# Altium PCB PCB1.PcbDoc (part 2 of 2)
Units mil, origin at the board's own origin, x right, y up, seen from the top; angles counter-clockwise.
Board outline 2505 x 2250 mil, 4 copper layers (Top Layer, GND1, GND2, Bottom Layer), stack 23.756 mil thick; 96 components, 62 nets, 306 pads, 129 vias.
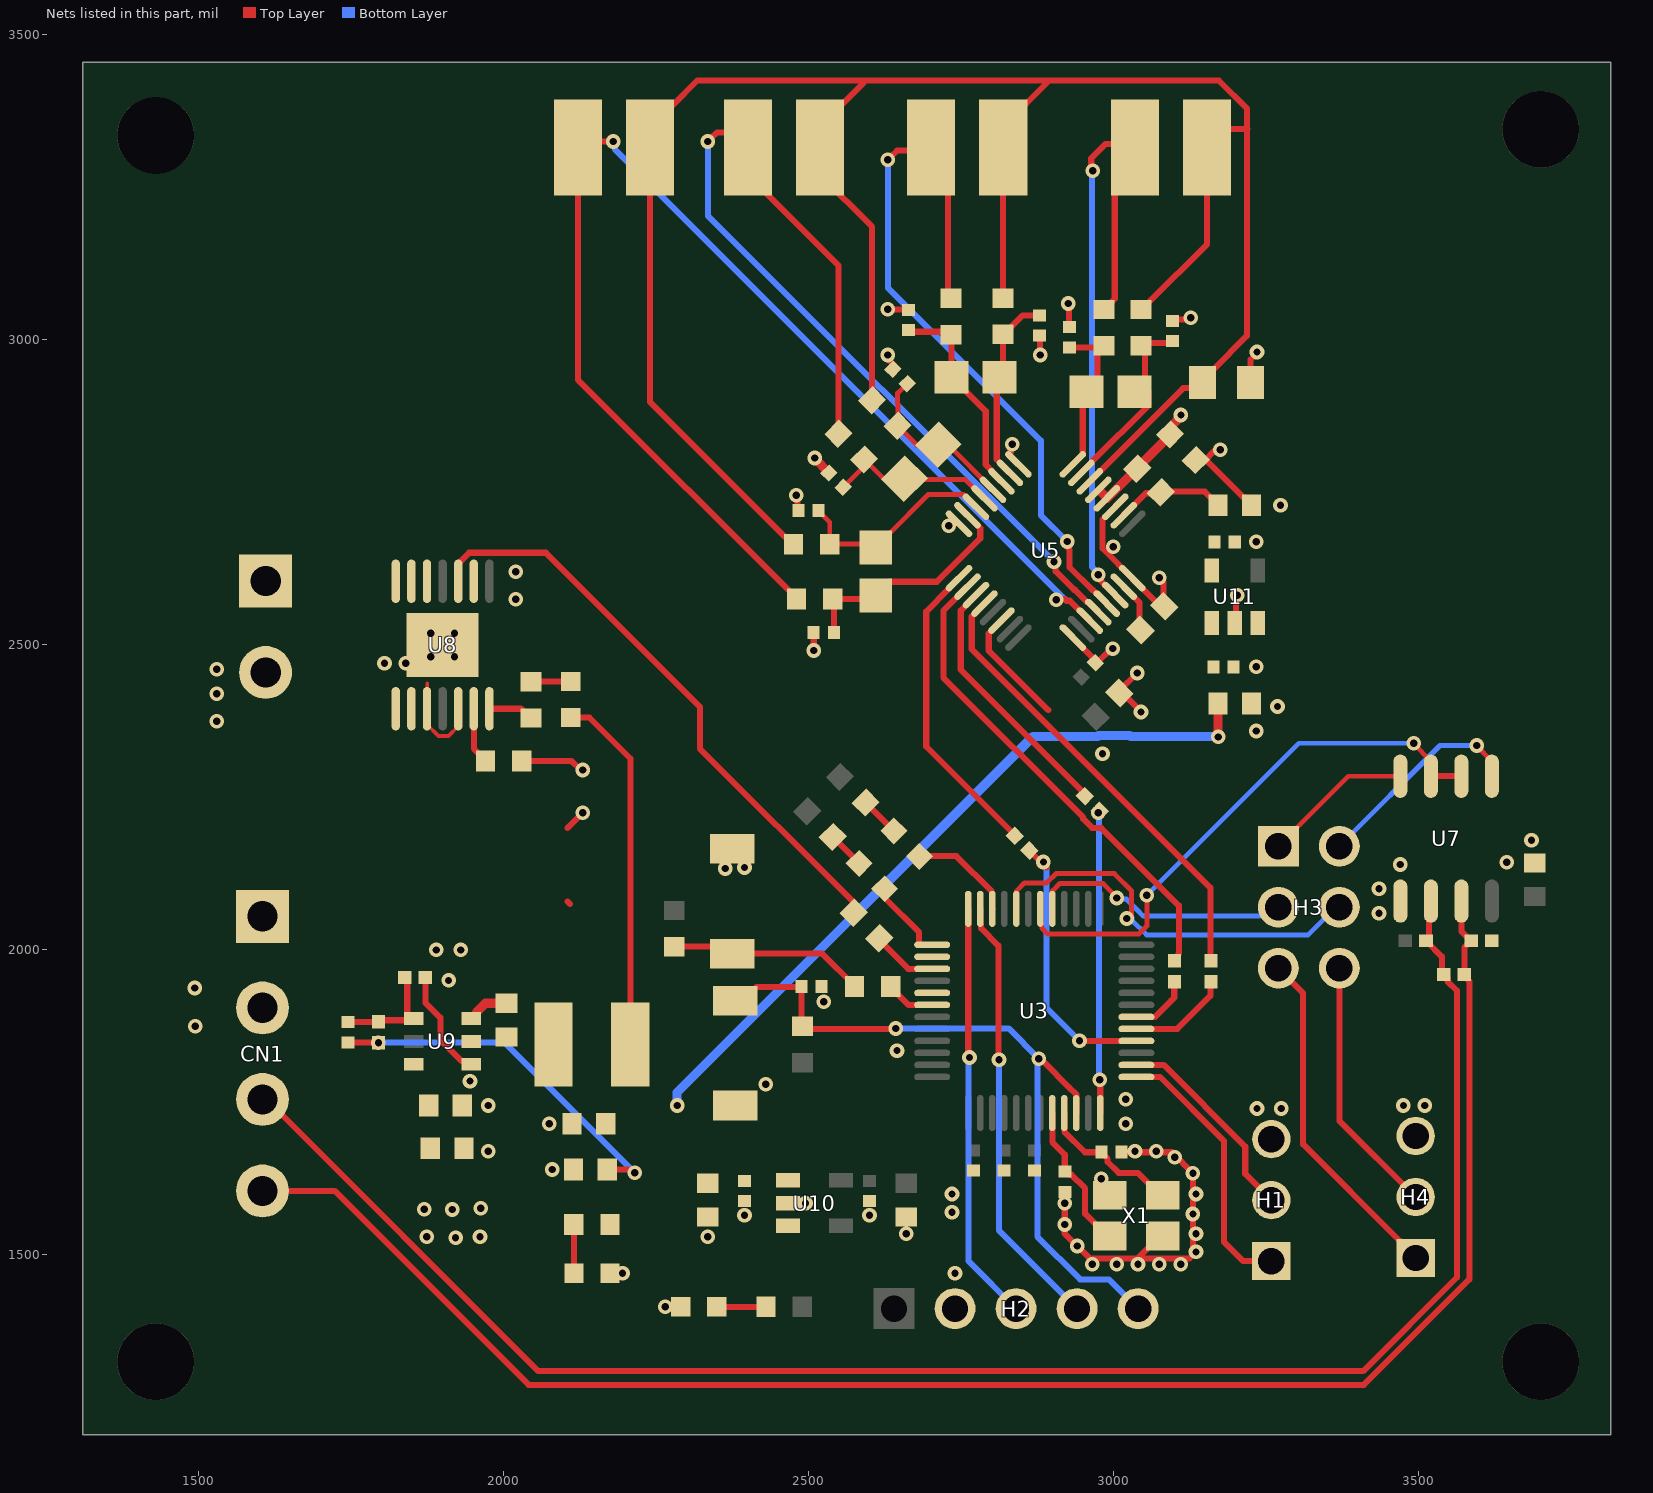
[diagram p4: the nets of this part, all layers, seen from the top]

## Via types
v1: diameter 24, hole 12, Top Layer to Bottom Layer, tented both sides, 125 vias
v2: diameter 24, hole 12, Top Layer to Bottom Layer, 4 vias

## Nets (pads, with @x,y where several pads share a name; then routed paths per layer and width w, separated by ;. In a path a pad name is that pad's centre, name@x,y a point inside that pad or via, vN(x,y) a via of type N, cw(c..) or ccw(c..) an arc to the next point about the centre after c; other vN are vias at no path point) (continued)
5V: C24.2 C25.1 C27.1 C30.2 C31.2 C34.1 C35.1 L1.2 LED2.2 R25.1 R28.2 U10.1 U10.3 U11.1 U11.3 | length 2389.4
  Top Layer w10: C24.2@1745,1848.46 1745.25,1848.21 1794.75,1848.21 v1(1795,1847.96) ; LED2.2@2110.18,2380.81 2140.93,2380.81 2207.99,2313.75 L1.2@2207.99,1845 ; C31.2@2170,1640 v1@2205,1640
  Top Layer w15: C34.1@3170.99,2403.89 3171.21,2403.67 3171.21,2349.33 v1(3171.42,2349.12)
  Bottom Layer w10: v1(1795,1847.96) 2002.04,1847.96 v1(2215,1635)
  Bottom Layer w15: v1@2284.6,1745.4 2284.6,1766.53 2867.8,2349.74 2974.05,2349.74 2975.6,2351.29 3026.48,2351.29 3028.03,2349.74 v1@3167.27,2349.74
  other v1: 2285,1745
485_RX: H3.2 U7.1 | length 344
  Top Layer w8: v1(3595,2335) 3595,2334.29 3620,2309.29 U7.1@3620,2284.73
  Bottom Layer w8: H3.2@3370,2170 3535,2335 v1@3585,2335
485_TX: H3.1 U7.4 | length 247.5
  Top Layer w8: H3.1@3270,2170 3384.73,2284.73 U7.4@3470,2284.73
A: CN1.3 R16.1 R18.2 U7.6 | length 2842.5
  Top Layer w10: CN1.3@1605,1755 1611.54,1755 2056.87,1309.67 3409.06,1309.67 3562.82,1463.43 3562.82,1933.1 3547.05,1948.87 3547.05,1954.37 3541.43,1960 R16.1@3540.92,1960 ; U7.6@3520,2080 3520,2052.59 3517.23,2049.82 3517.23,2020.19 R18.2@3512.04,2015 3537.98,1989.06 R16.1@3537.98,1963.45
A3V3: C4.1 C36.1 C37.1 U5.26 U11.5 | length 177.5
  Top Layer w10: U5.26@3016.61,2712.35 3052.78,2748.52 3076.14,2748.52 C4.1@3077.53,2749.91 3078.92,2751.3 3149.61,2751.3 C37.1@3169.66,2731.25
AIN0: C3.1 C6.2 R1.1 U5.7 | length 385.9
  Top Layer w10: C3.1@2541.54,2520 2541.54,2573.12 R1.1@2539.66,2575 2604.37,2575 C6.2@2610,2580.63 2610,2581.81 2631.57,2603.39 2710.28,2603.39 2781.37,2674.47 2781.37,2691.2 2760.5,2712.07 U5.7@2760.5,2712.35
AIN1: C6.1 C10.1 R2.1 U5.6 | length 348.3
  Top Layer w8: C10.1@2516.54,2720 2516.54,2719.21 2534.66,2701.09 R2.1@2534.66,2665 2604.37,2665 C6.1@2610,2659.37 ; C6.1@2610,2660.55 2632.57,2683.13 2632.8,2683.13 2695.83,2746.15 2753.71,2746.15 2773.59,2726.27 U5.6@2774.41,2726.27
AIN2: C12.1 C13.2 R5.1 U5.5 | length 280.3
  Top Layer w8: C12.1@2556.7,2758.3 2590.97,2792.58 R5.1@2590.97,2795.47 ; R5.1@2590.97,2804.03 2590.97,2798.35 2593.86,2795.47 2594.38,2795.99 2599.73,2795.99 2624.4,2771.33 2656.33,2771.33 2658,2773 2689.92,2773 2692.2,2770.72 2756.99,2770.72 2787.52,2740.19 U5.5@2788.34,2740.19
AIN3: C13.1 C15.1 R8.1 U5.4 | length 275.7
  Top Layer w8: R8.1@2645.97,2859.03 2678,2827 2712,2827 C13.1@2712.84,2827.84 2728.69,2827.84 U5.4@2802.25,2754.27 ; R8.1@2646.77,2859.83 2646.77,2895.21 2645.97,2896.01 2645.97,2912.58 C15.1@2661.7,2928.3
AIN4: C17.1 C18.2 R10.1 U5.3 | length 347.7
  Top Layer w10: C17.1@2663.55,3015.81 2666.22,3013.14 2728.96,3013.14 2734.18,3007.92 C18.2@2734.18,2938.55 ; C18.2@2734.93,2938.55 2735.36,2938.55 2756.94,2916.97 2756.94,2916.54 2790.48,2883 2790.48,2795.37 2799.69,2786.16 2799.69,2784.51 U5.3@2816.17,2768.03
AIN5: C18.1 C19.1 R11.1 U5.2 | length 311.9
  Top Layer w10: R11.1@2818.55,3008.89 2818.55,2939.63 2808.48,2929.56 2808.48,2803.83 2830.09,2782.22 U5.2@2830.09,2781.94 ; R11.1@2819.69,3008.89 2850.89,3040.09 C19.1@2878.55,3040.09
AIN6: C20.1 C22.2 R12.1 U5.32 | length 319.5
  Top Layer w10: C20.1@2927.77,2987.52 2981.5,2987.52 R12.1@2984.32,2990.34 2973.58,2979.6 2973.58,2932.95 2949.38,2908.75 U5.32@2949.38,2812.15 ; U5.32@2933.09,2795.87 U5.32@2949.38,2812.15 ; U5.32@2933.09,2795.87 U5.32@2949.38,2812.15 ; U5.32@2933.09,2795.87 U5.32@2949.38,2812.15
AIN7: C22.1 C23.1 R14.1 U5.31 | length 341
  Top Layer w10: U5.31@2947.08,2782.68 2947.47,2782.68 2963.5,2798.7 2963.5,2799.22 3057.22,2892.95 3057.22,2915 C22.1@3034.37,2915 3051.59,2932.22 3051.59,2983.75 R14.1@3045,2990.34 3049.54,2994.88 3093.83,2994.88 C23.1@3096.72,2997.77
AIN8: R12.2 U5.22 U6.1 | length 1107.6
  Top Layer w10: v1(2965.89,3276.86) 2963.4,3279.36 2963.4,3297.54 2986.49,3320.63 3020.63,3320.63 3025,3325 U6.1@3035,3315 3035,3275.63 3001.94,3242.57 3001.94,3067.28 2996.33,3061.67 2996.33,3060.54 2985.45,3049.66 R12.2@2984.32,3049.66 ; v1(2975,2615) 2975,2609.2 U5.22@3002.69,2581.51
  Bottom Layer w10: v1(2965.89,3276.86) 2964.44,3275.41 2964.44,2628.09 2975,2617.53 v1(2975,2615)
AIN9: R10.2 U4.1 U5.21 | length 1206.6
  Top Layer w10: v1@2635,3300 2645,3310 U4.1@2701.04,3310 ; U4.1@2701.04,3315 2728.65,3287.39 2728.65,3072.77 R10.2@2733.55,3067.87 ; v1@2927.86,2668.69 2926.49,2667.32 2926.49,2657.92 2927.86,2656.55 2927.86,2626.79 2964.64,2590 2966.08,2590 2988.49,2567.58 U5.21@2988.77,2567.58
  Bottom Layer w10: v1(2630,3295) 2630,3085.36 2880.74,2834.62 2880.74,2712.47 v1(2923.81,2669.41)
AIN10: R5.2 U2.1 U5.20 | length 1639
  Top Layer w10: v1@2340,3330 2350,3340 2370.44,3340 2400.44,3310 2400.44,3270.63 2549.03,3122.04 2549.03,2862.95 2549.83,2862.15 2549.83,2846.77 R5.2@2549.03,2845.97 ; v1@2900,2630 2904.58,2630 2905.01,2629.57 2905.01,2620.51 2935.2,2590.32 2936.54,2590.32 2956.71,2570.15 2958.37,2570.15 U5.20@2974.86,2553.67
  Bottom Layer w10: v1(2335,3325) 2335,3203.39 v1(2902.36,2636.04)
AIN11: R1.2 U1.1 U5.19 | length 2049.9
  Top Layer w10: v1@2170,3325 2136.89,3325 2121.89,3310 2121.89,2934.58 2480.34,2576.13 R1.2@2480.34,2575 ; 2920,2575 2922.68,2572.32 2928.36,2572.32 U5.19@2960.93,2539.75
  Bottom Layer w10: v1(2180,3325) 2182.68,3322.32 2182.68,3312.32 2920,2575
  other v1: 2905.93,2574.07
B: CN1.4 R15.1 R16.2 U7.7 | length 2816.2
  Top Layer w10: CN1.4@1605,1605 1723.23,1605 2041.04,1287.2 3410.36,1287.2 3583.11,1459.94 3583.11,1948.51 3581.14,1950.48 3581.14,1954.37 3575.51,1960 R16.2@3575,1960 3575,2004.08 3578.78,2007.87 3578.78,2008.37 R15.1@3585.41,2015 ; U7.7@3570,2080 3570,2030.41 R15.1@3585.41,2015 ; R15.1@3585.92,2015 R15.1@3585.41,2015
BUTTON: R20.1 U3.42 | length 81.2
  Top Layer w10: R20.1@2634.66,1940 2634.66,1938.87 2663.57,1909.96 2702.56,1909.96 U3.42@2702.68,1909.84
CS: R3.1 U3.16 | length 439.3
  Top Layer w10: R3.1@2862.05,2162.95 v1@2890,2135 ; v1(2944.07,1850.87) 2944.11,1850.83 U3.16@3037.32,1850.79 U3.16@3037.32,1850.79
  Bottom Layer w10: v1@2890,2135 2890,1904.94 v1(2944.07,1850.87)
  other v1: 2884.96,2144.03
DE/RE#: U3.30 U7.2 U7.3 | length 919.8
  Top Layer w8: U3.30@2879.84,2067.32 2879.84,2042.4 2882.22,2040.02 2882.22,2035.94 2892.36,2025.79 2985.44,2025.79 2985.8,2026.15 3041.48,2026.15 3054.46,2039.13 v1@3054.46,2088.33 ; v1(3491.75,2338.71) 3491.75,2337.77 3520,2309.52 U7.3@3520,2284.73
  Top Layer w10: U7.3@3520,2284.73 U7.2@3570,2284.73
  Bottom Layer w8: v1(3054.37,2089.53) 3303.55,2338.71 v1(3491.75,2338.71)
DIN: R7.1 U3.18 | length 101.6
  Top Layer w10: U3.18@3037.32,1890.16 3037.44,1890.28 3067.87,1890.28 3094.36,1916.76 3094.36,1916.82 3099.36,1921.83 3099.36,1947.32 R7.1@3100,1947.96
DOUT: R9.1 U3.17 | length 167.5
  Top Layer w10: U3.17@3037.32,1870.47 3037.44,1870.59 3104.36,1870.59 3158.68,1924.9 3158.68,1946.64 R9.1@3160,1947.96
EN: R23.1 U3.39 | length 110
  Top Layer w10: R23.1@2615.97,2019.03 2614.71,2017.77 2663.46,1969.02 2702.56,1969.02 U3.39@2702.68,1968.9
GND: C1.2 C2.2 C3.2 C4.2 C5.1 C7.2 C8.2 C9.2 C10.2 C11.1 C12.2 C14.2 C15.2 C16.1 C17.2 C19.2 C20.2 C21.1 C23.2 C25.2 C26.2 C27.2 C28.2 C30.1 C31.1 C32.1 C33.1 C34.2 C35.2 C36.2 C37.2 CN1.2 H1.3 H2.2 H4.3 LED4.1 LED5.1 P1.2 R13.1 R13.2 R15.2 R17.2 R24.1 R26.2 SW1.1 SW2.1 U5.1 U5.8 U5.14 U5.17 U5.24 U5.27 U5.28 U5.29 U7.5 U8.2 U8.15 U9.4 U10.2 U11.2 X1.2 X1.4 | length 2382.8
  Top Layer w8: U9.4@1934.98,1819.07 1940.77,1819.07 U9.4@1947.25,1812.6
  Top Layer w10: R24.1@1872.04,1955 1872.04,1913.32 1896.49,1888.87 1896.49,1852.49 1930.9,1818.07 1941.77,1818.07 U9.4@1947.25,1812.6 ; R26.2@2029.83,2309.78 2111.43,2309.78 2126.21,2295 v1(2130,2295) ; 2104.99,2079.08 2108.78,2075.29 ; 2104.99,2199.99 v1(2130,2225) ; v1(2480,2745) 2481.73,2743.27 2481.73,2721.73 C10.2@2483.46,2720 ; v1(2508.46,2490.77) C3.2@2508.46,2520 ; v1(2630,2975) 2632.68,2972.32 2632.68,2965.28 2638.86,2959.1 2638.86,2952.25 C15.2@2638.45,2951.85 ; v1(2630,3050) 2630.56,3049.44 2663,3049.44 C17.2@2663.55,3048.89 ; U5.14@2816.17,2539.75 2816.17,2539.47 2795.3,2518.59 2795.3,2490.64 2892.97,2392.97 ; v1@2834.46,2828.75 2831.41,2825.7 2831.41,2816.11 2827.92,2812.63 2827.92,2811.96 U5.1@2844.01,2795.87 ; C19.2@2878.55,3007.01 2879.28,3006.28 2879.28,2975.72 v1(2880,2975) ; C9.2@2920,1603.46 2920,1535 2960.69,1494.31 v1@3039.93,1494.31 ; v1(2925.52,3059.59) 2926.64,3058.47 2926.64,3021.72 C20.2@2927.77,3020.6 ; U5.17@2933.09,2511.91 2933.09,2511.63 2970.25,2474.48 C5.1@2970.25,2470.58 2972.75,2470.58 2996.05,2493.89 v1(2998.55,2493.89) ; U5.27@3002.69,2726.27 3002.69,2725.99 2981.81,2705.11 2981.81,2658.07 U5.24@3030.53,2609.35 3076.51,2563.38 C14.2@3083.04,2563.38 3081.65,2564.77 3081.65,2603.35 v1(3075,2610) ; C11.1@3013,1668.39 3095.75,1668.39 v1(3130,1634.14) 3130,1500.16 3124.14,1494.31 v1@3039.93,1494.31 ; v1(3038.55,2453.89) 3009.43,2424.77 C8.2@3009.43,2421.14 3013.86,2421.14 v1(3045,2390) ; X1.4@3080.49,1530.93 3076.55,1530.93 v1@3039.93,1494.31 ; C23.2@3096.72,3030.85 3099.28,3033.41 3124.01,3033.41 v1(3126.57,3035.97) ; R13.1@3134.53,2802.91 3149.91,2802.91 3164.31,2817.32 3172.32,2817.32 v1(3175,2820) ; R13.1@3135.33,2803.72 3150.71,2803.72 3212.82,2741.6 3215.37,2741.6 3226.11,2730.86 C37.2@3226.11,2728.89 ; U11.2@3198.55,2535.58 3200.7,2537.73 3200.7,2579.29 v1(3202.84,2581.44) ; R17.2@3224.37,2930 3224.37,2967.68 3235,2978.3 v1(3235,2980)
  Top Layer w15: v1(2509.92,2806.38) 2509.92,2805.73 2533.3,2782.35 C12.2@2533.3,2781.7 ; 2980,2750 2988.77,2741.23 U5.28@2988.77,2740.19 2989.31,2740.19 3038.01,2788.89 C4.2@3038.55,2788.89 3038.55,2789.86 3092.58,2843.89 R13.2@3092.58,2844.86 3092.58,2856.47 3110.33,2874.22 v1(3110.33,2876.66)
  other v1: 2265,1415 2195,1470 2740,1470 2965,1485 3005,1485 3040,1485 3075,1485 3110,1485 3135,1505 2940.35,1514.65 1921.46,1528.21 1874.28,1529.74 1961.57,1529.62 2335,1530 2660,1535 3135,1535 2920,1550 2395,1565 2600,1565 3130,1567.15 2735,1570 1915.79,1574.45 1870,1575 1962.51,1576.81 2495,1585 2920,1585 2735,1600 3135,1600 2980,1625 2080,1640 3100,1660 1975,1670 3035,1670 3070,1670 2075,1715 3020,1715 3235,1740 3275,1740 1975,1745 3475,1745 3510,1745 3020,1755 2430,1780 1945,1785 2645,1835 1495,1875 2525,1915 1494.08,1937.69 1910,1950 1890,2000 1930,2000 3435,2060 3435,2100 2363.56,2133.49 2395,2135 3470,2140 3644.46,2143.58 3685,2180 2981.7,2321.3 3233.55,2358.89 1530,2375 3268.55,2398.89 1530,2420 1530,2460 3233.55,2463.89 1805,2470 1840,2470 2020,2575 2020,2620 2999.24,2660.65 3233.55,2668.89 2730,2695 3273.55,2728.89 2834.09,2828.75
  other v2: 1880.67,2480.29 1919.67,2480.28 1880.68,2519.28 1919.67,2519.28
NetC9_1: C9.1 U3.8 X1.3 | length 246.6
  Top Layer w10: U3.8@2899.53,1732.68 2899.53,1685.07 2920,1664.6 C9.1@2920,1636.54 2924.84,1631.7 2930.62,1631.7 2953.31,1609.01 2953.31,1567.55 2985.86,1535 2990,1535 2990,1534.79 X1.3@2993.87,1530.93
NetC11_2: C11.2 U3.9 X1.1 | length 238.3
  Top Layer w10: U3.9@2919.21,1732.68 2919.33,1732.56 2919.33,1702.14 2953.08,1668.39 C11.2@2979.92,1668.39 2979.92,1667.6 2990.16,1657.36 2990.16,1652.37 3008.06,1634.48 3039.93,1634.48 3076.55,1597.86 X1.1@3080.49,1597.86
NetC14_1: C14.1 U5.23 | length 82.4
  Top Layer w10: U5.23@3016.61,2595.42 3016.61,2595.15 3042.67,2569.08 3042.67,2525.79 C14.1@3044.07,2524.4
NetC24_1: C24.1 R24.2 R25.2 U9.1 | length 186.3
  Top Layer w8: C24.1@1745,1881.54 C24.1@1745.25,1881.79 ; R25.2@1794.75,1881.79 R25.2@1795,1882.04 R25.2@1797.68,1884.72 ; R24.2@1837.96,1955 R24.2@1842.18,1950.78 ; U9.1@1842.18,1893.87 1848.65,1887.4 U9.1@1852.75,1887.4 U9.1@1850.07,1884.72
  Top Layer w10: C24.1@1745.25,1881.79 R25.2@1794.75,1881.79 ; R25.2@1797.68,1884.72 U9.1@1850.07,1884.72 ; U9.1@1842.18,1893.87 R24.2@1842.18,1950.78
NetC29_1: C29.1 L1.1 U9.5
NetC29_2: C29.2 U9.6 | length 72.4
  Top Layer w15: U9.6@1947.25,1887.4 1952.52,1887.4 1955.49,1890.37 1955.49,1897.51 1970.54,1912.56 C29.2@2005,1912.56
NetLED1_2: LED1.2 R21.1 | length 65.9
  Top Layer w10: R21.1@2593.44,2241.57 LED1.2@2640,2195
NetLED2_1: LED2.1 R22.2 | length 65.1
  Top Layer w10: R22.2@2045.17,2439.44 2045.51,2439.78 LED2.1@2110.17,2439.78
NetLED3_2: LED3.2 R27.1 | length 61.2
  Top Layer w10: R27.1@2539.77,2185.23 LED3.2@2583.04,2141.96
NetLED4_2: LED4.2 R28.1 | length 80.1
  Top Layer w10: R28.1@2115.34,1550 2115.34,1470.17 LED4.2@2115.51,1469.99
NetLED5_2: LED5.2 R29.1 | length 80.9
  Top Layer w10: LED5.2@2349.49,1415.01 R29.1@2430.34,1415
NetR3_2: R3.2 U5.9 | length 504.6
  Top Layer w10: U5.9@2746.57,2609.35 2730.09,2592.86 2730.09,2591.69 2692.87,2554.47 2692.87,2333.43 2837.95,2188.34 R3.2@2837.95,2187.05
NetR4_2: R4.2 U5.11 | length 424.1
  Top Layer w10: U5.11@2774.42,2581.5 2774.42,2581.22 2749.46,2556.26 2749.46,2459.32 2952.95,2255.83 R4.2@2952.95,2252.05
NetR7_2: R7.2 U5.10 | length 801.3
  Top Layer w10: U5.10@2760.5,2595.42 2721.07,2556 2721.07,2446.38 2950,2217.45 2950,2214.64 2964.64,2200 2971.58,2200 2972.02,2199.56 2980,2199.56 3107.1,2072.47 3107.1,1994.03 3105.63,1992.56 3105.63,1987.67 R7.2@3100,1982.04
NetR9_2: R9.2 U5.12 | length 756.8
  Top Layer w10: U5.12@2788.34,2567.58 2788.34,2567.31 2767.46,2546.43 2767.46,2493.03 3158.63,2101.86 3158.63,1983.41 R9.2@3160,1982.04
NetR19_1: R19.1 R20.2 SW2.2 | length 323.1
  Top Layer w10: R19.1@2280,2005.34 2363.64,2005.34 SW2.2@2375,1993.98 2522.49,1993.98 2575.34,1941.13 R20.2@2575.34,1940
NetR22_1: R22.1 U8.14 | length 74.5
  Top Layer w10: U8.14@1976.94,2395.27 2028.89,2395.27 2044.04,2380.12 R22.1@2045.17,2380.12
NetR23_2: R23.2 U8.3 | length 979.4
  Top Layer w10: U8.3@1925.76,2604.29 1925.76,2633.01 1943.65,2650.9 2069.4,2650.9 2322,2398.3 2322,2329.98 2574.83,2077.15 2574.83,2061.77 R23.2@2574.03,2060.97
NetR26_1: R26.1 U8.13 | length 93.4
  Top Layer w10: U8.13@1951.35,2395.27 1951.35,2330.08 1970.51,2310.92 R26.1@1970.51,2309.78
NRST: C16.2 H2.5 R6.1 SW1.2 U3.10 | length 1202.9
  Top Layer w10: SW1.2@2380,1917.04 2392.4,1917.04 2414.42,1939.06 2483.62,1939.06 2484.56,1940 C16.2@2488.46,1940 2488.46,1876.2 2494.47,1870.19 2641.66,1870.19 v1(2642.78,1871.31) ; v1@2886.27,1815.57 2926.63,1775.21 2926.8,1775.21 2938.78,1763.22 2938.78,1732.8 U3.10@2938.9,1732.68
  Bottom Layer w10: v1(2642.78,1871.31) 2827.96,1871.31 v1(2877.47,1821.77) ; v1@2875,1819.98 2875,1530 2945,1460 2992.2,1460 H2.5@3040.05,1412.16
PA12: LED1.1 U3.34 | length 171.3
  Top Layer w10: LED1.1@2682.22,2153.82 2696.39,2153.82 2696.91,2153.3 2697.42,2153.82 2742.21,2153.82 2800.98,2095.05 2800.98,2067.44 U3.34@2801.1,2067.32
PA15: LED3.1 U3.37 | length 136.7
  Top Layer w10: LED3.1@2624.75,2100.26 2624.75,2085.06 2681.22,2028.59 2681.22,2008.56 2681.51,2008.27 U3.37@2702.68,2008.27
PD0: U3.38
PD3: U3.41
REFP0: R2.2 R8.2 R11.2 R14.2 R17.1 U1.2 U2.2 U4.2 U5.30 U6.2 | length 3908.7
  Top Layer w10: R2.2@2475.34,2665 2475.34,2666.13 2464.46,2677.01 2461.3,2677.01 2240,2898.31 2240,3349.37 2274.37,3383.74 2276.4,3383.74 2317.66,3425 2590,3425 ; R8.2@2604.03,2900.97 2604.83,2901.77 2604.83,2917.15 2604.03,2917.95 2604.03,3185.15 2518.55,3270.63 2518.55,3349.37 2590,3420.82 2590,3425 ; R11.2@2818.55,3068.21 2818.55,3314.41 U4.2@2819.15,3315 2819.15,3349.37 2894.78,3425 2895,3425 ; U5.30@2961.41,2768.03 2961.41,2768.23 2978.01,2784.83 2978.21,2784.83 3114.19,2920.81 3132.58,2920.81 R17.1@3145.63,2933.85 ; R14.2@3045,3049.66 3055.88,3060.54 3057.12,3060.54 3153.11,3156.53 U6.2@3153.11,3315 3183.37,3345.26 3219.41,3345.26 ; R17.1@3145.63,2934.81 3162.92,2952.11 3163.84,2952.11 3218.4,3006.67 3218.4,3345.26 ; 3218.91,3345.26 3218.91,3378.68 3172.59,3425 2895,3425 ; 2590,3425 2895,3425
SCLK: R4.1 U3.12 | length 493.7
  Top Layer w10: v1(2977.04,1786.96) 2978.15,1785.85 2978.15,1732.8 U3.12@2978.27,1732.68
  Bottom Layer w10: v1(2975,2225) 2976.02,2223.98 2976.02,1787.98 v1(2977.04,1786.96)
SWCLK: H2.3 U3.36 | length 688.8
  Top Layer w10: U3.36@2761.73,2067.32 2761.73,1825.76 v1(2763.73,1823.77)
  Bottom Layer w10: v1(2763.73,1823.77) 2762.29,1822.33 2762.29,1489.91 H2.3@2840.05,1412.16
SWDIO: H2.4 U3.35 | length 712.1
  Top Layer w10: U3.35@2781.42,2067.32 2781.42,2042.94 2782.78,2041.57 2782.78,2035.52 2811.2,2007.11 v1@2811.2,1823.93
  Bottom Layer w10: v1@2812.25,1815.64 2812.25,1539.95 H2.4@2940.05,1412.16
  other v1: 2812.25,1819.89
TTL_RX: H3.6 H4.2 | length 426.8
  Top Layer w10: H3.6@3370,1970 3370,1720 H4.2@3495,1595
TTL_TX: H3.5 H4.1 | length 568.5
  Top Layer w10: H3.5@3270,1970 3310.68,1929.32 3310.68,1681.53 3468.5,1523.71 3468.5,1521 3494.5,1495 H4.1@3495,1495
USART1_RX: H3.4 U3.32 | length 657.7
  Top Layer w8: U3.32@2840.47,2067.32 2840.97,2067.82 2840.97,2096.83 2854,2109.86 2890.42,2109.86 2905.51,2124.95 3001.16,2124.95 3029.52,2096.6 v1@3029.52,2053.67
  Bottom Layer w8: v1@3030.03,2052.99 3030.03,2048.71 3054.2,2024.54 3318.69,2024.54 3364.16,2070 H3.4@3370,2070
  other v1: 3021.72,2051.41
USART1_TX: H3.3 U3.29 | length 423.4
  Top Layer w8: U3.29@2899.53,2067.32 2900.03,2067.82 2900.03,2097.19 2911.69,2108.85 2982.58,2108.85 2984.58,2106.85 2993.59,2097.88 ; 2993.59,2097.84 v1@2998.74,2092.68
  Bottom Layer w8: v1@3005.52,2085.52 3007.89,2083.15 3021.09,2083.15 3043.72,2060.52 3043.72,2060.21 3048.4,2055.52 3239.58,2055.52 3254.05,2070 H3.3@3270,2070
  other v1: 3005,2085
USART2_RX: H1.2 U3.14 | length 339.2
  Top Layer w10: U3.14@3037.32,1811.42 3081.85,1811.42 3215.71,1677.56 3215.71,1632.99 H1.2@3258.69,1590
USART2_TX: H1.1 U3.13 | length 443.4
  Top Layer w10: U3.13@3037.32,1791.73 3076.08,1791.73 3181.16,1686.65 3181.16,1521.04 3212.2,1490 H1.1@3258.69,1490
VIN: C32.2 C33.2 CN1.1 U8.8 U8.9 U8.10 U8.12 U9.3 | length 161.6
  Top Layer w6: 1875,2437.12 1875,2369.26 1893.59,2350.66 1909.87,2350.66 1925.76,2366.55 U8.12@1925.76,2395.27
VOUT: P1.1 U8.5 U8.6 U8.7
pads on no net: *1.1 *2.1 *3.1 *4.1 U3.1 U3.2 U3.3 U3.7 U3.11 U3.15 U3.19 U3.20 U3.21 U3.22 U3.23 U3.24 U3.25 U3.26 U3.27 U3.28 U3.31 U3.33 U3.40 U3.43 U3.44 U3.45 U3.46 U3.47 U3.48 U5.13 U5.25 U8.1 U8.4 U8.11 U9.2 U10.4 U11.4
copper on no net:
  other v1: 2938.37,2715.36

## Polygon pours and split planes (outlines as drawn)
VIN on Top Layer "NONET_L-01_P-001" (hatched Horizontal grid 4 track 5, remove dead copper, pour order 45): 1535,1960 1650,1960 1675,1935 1675,1705 1795,1705 1855,1645 1910,1645 1910,1765 1875,1800 1875,1835 1720,1835 1715,1830 1710,1835 1710,2181.46 1885.39,2356.86 1885,2357.25 1885,2440 1795,2440 1535,2180 1535,2175
GND on Top Layer "NONET_L-01_P-001" (hatched Horizontal grid 4 track 5, remove dead copper, pour order 46): 1315,3452.07 1315,1219.93 3810,1219.93 3810,3452.07
VOUT on Top Layer "NONET_L-01_P-001" (hatched Horizontal grid 4 track 5, remove dead copper, pour order 5): 1885.17,2694.78 1885.17,2569.78 1870.17,2554.78 1535.17,2554.78 1535.17,2694.78 1555.17,2704.78 1560.17,2709.78 1845.17,2709.78
NetC29_1 on Top Layer "NONET_L-01_P-001" (hatched Horizontal grid 4 track 5, remove dead copper, pour order 1): 1925,1875 1925,1830 1970,1830 2040,1760 2125,1760 2145,1780 2145,1935 2040,1935 2040,1890 1995,1890 1980,1875
5V on Top Layer "NONET_L-01_P-001" (hatched Horizontal grid 4 track 5, remove dead copper, pour order 18): 3138.55,2373.89 3143.55,2368.89 3203.55,2368.89 3203.55,2428.89 3178.55,2453.89 3178.55,2498.89 3268.55,2498.89 3268.55,2558.89 3228.55,2558.89 3218.55,2558.89 3218.55,2518.89 3183.55,2518.89 3178.55,2523.89 3178.55,2568.89 3138.55,2568.89 3133.55,2563.89 3133.55,2418.89
5V on Top Layer "NONET_L-01_P-001" (hatched Horizontal grid 4 track 5, remove dead copper, pour order 14): 2160,1940 2155,1935 2155,1745 2145,1735 2145,1510 2225,1510 2310,1595 2370,1595 2370,1600 2380,1610 2420,1610 2420,1520 2425,1515 2505,1515 2505,1560 2495,1570 2440,1570 2440,1595 2445,1600 2500,1600 2500,1655 2375,1780 2270,1780 2270,1940
A3V3 on Top Layer "NONET_L-01_P-001" (hatched Horizontal grid 4 track 5, remove dead copper, pour order 42): 3140,2595 3185,2595 3185,2695 3190,2700 3190,2770 3145,2770 3140,2765
5V on Top Layer "NONET_L-01_P-001" (hatched Horizontal grid 4 track 5, remove dead copper, pour order 41): 3200,2325 3195,2330 3195,2440 3180,2455 3180,2495 3260,2495 3275,2510 3270,2515 3270,2565 3215,2565 3215,2500 3190,2500 3180,2510 3185,2515 3185,2565 3140,2565 3135,2560 3140,2555 3140,2325
5V on Top Layer "NONET_L-01_P-001" (hatched Horizontal grid 4 track 5, remove dead copper, pour order 39): 2165,1935 2160,1930 2160,1755 2155,1755 2140,1740 2145,1735 2145,1510 2235,1510 2240,1505 2330,1595 2425,1595 2430,1590 2430,1525 2500,1525 2500,1565 2455,1565 2450,1570 2450,1605 2485,1605 2490,1610 2490,1690 2245,1935
3V3 on Top Layer "NONET_L-01_P-001" (hatched Horizontal grid 4 track 5, remove dead copper, pour order 22): 2983.55,2348.89 3013.55,2378.89 3013.55,2388.89 3011.05,2388.89 2958.55,2441.39 2958.55,2458.89 2858.55,2553.89 2803.55,2513.89 2803.55,2503.89 2963.55,2343.89
3V3 on Top Layer "NONET_L-01_P-001" (hatched Horizontal grid 4 track 5, remove dead copper, pour order 3): 2515,1650 2520,1645 2520,1595 2570,1595 2585,1610 2615,1610 2635,1590 2700,1590 2700,1605 2755,1660 2890,1660 2890,1690 2885,1695 2870,1695 2870,1780 2810,1780 2810,1700 2805,1695 2720,1695 2680,1655
GND on Bottom Layer "NONET_L-01_P-001" (hatched Horizontal grid 4 track 5, remove dead copper, pour order 37): 1315,3450 1315,1222.24 3805,1222.24 3805,3450
GND on GND1 "NONET_L-01_P-001" (hatched Horizontal grid 4 track 5, remove dead copper, pour order 44): 1320,3455 1320,1217.5 3805,1217.5 3805,3455
GND on GND2 "NONET_L-01_P-001" (hatched Horizontal grid 4 track 5, remove dead copper, pour order 43): 1315,3450 1315,1217.5 3805,1217.5 3805,3450

## Other copper
Top Layer:
  pour cut-out: 2028.96,3456.04 2040,3445 2040,2790.44 2434.4,2396.04 2873.96,2396.04 2873.96,2401.04 3118.96,2646.04 3118.96,2851.04 3230.6,2851.04 3468.96,3089.4 3468.96,3446.04 3463.96,3451.04
  pour cut-out: 3590,1440 3590,1220 3810,1220 3810,1440
  pour cut-out: 1315,1440 1315,1220 1535,1220 1535,1440
  pour cut-out: 3590,3455 3590,3235 3810,3235 3810,3455
  pour cut-out: 1320,3450 1320,3230 1540,3230 1540,3450
  pour cut-out: 2905,1620 2905,1525 2960,1470 3125,1470 3125,1475 3155,1505 3150,1510 3150,1640 3145,1640 3095,1690 3005,1690
GND1:
  pour cut-out: 3585,1430 3585,1210 3805,1210 3805,1430
  pour cut-out: 1320,1440 1320,1220 1540,1220 1540,1440
  pour cut-out: 1320,3450 1320,3230 1540,3230 1540,3450
  pour cut-out: 3590,3455 3590,3235 3810,3235 3810,3455
GND2:
  pour cut-out: 3590,1430 3590,1210 3810,1210 3810,1430
  pour cut-out: 1315,1435 1315,1215 1535,1215 1535,1435
  pour cut-out: 1320,3450 1320,3230 1540,3230 1540,3450
  pour cut-out: 3585,3460 3585,3240 3805,3240 3805,3460
Bottom Layer:
  pour cut-out: 3590,3455 3590,3235 3810,3235 3810,3455
  pour cut-out: 1320,3450 1320,3230 1540,3230 1540,3450
  pour cut-out: 1320,1435 1320,1215 1540,1215 1540,1435
  pour cut-out: 3590,1435 3590,1215 3810,1215 3810,1435

## Silkscreen, mask and mechanical layers (free items; w line width, h text height)
Top Overlay:
  text "1+" at 2095,3410 h30
  text "1-" at 2220,3410 h30
  text "2+" at 2390,3410 h30
  text "2-" at 2505,3410 h30
  text "3+" at 2685,3410 h30
  text "3-" at 2795,3410 h30
  text "4+" at 3015,3410 h30
  text "4-" at 3130,3410 h30
  text "ADS124S08_RTD_Acq" at 1475,3125 h30
  text "Ver1.0" at 1480,3060 h30
  text "2026/9/8" at 1480,3000 h30
  text "VOUT+" at 1555,2720 h30
  text "GND" at 1580,2315 h30
  text "485" at 3216.39,2251.78 h30
  text "485" at 3331.39,2251.78 h30
  text "VIN+" at 1685,2100 h30
  text "FLT" at 2171.66,2031.98 h30
  text "GND" at 1690,1965 h30
  text "TTL" at 3210,1865 h30
  text "TTL" at 3340,1865 h30
  text "RST" at 2305,1755 h30 r90
  text "A" at 1685,1735 h30
  text "GND" at 3330,1675 h30
  text "GND" at 3579.68,1670 h30
  text "B" at 1692.51,1586.66 h30
  text "RX1" at 3581.57,1576.65 h30
  text "RX2" at 3330,1575 h30
  text "TX1" at 3581.92,1476.23 h30
  text "TX2" at 3330,1470 h30
  text "5VLED" at 1960,1450 h30
  text "3V3LED" at 2255.17,1343.34 h30
  text "3V3" at 2580.52,1310.3 h30
  text "GND" at 2690,1310.3 h30
  text "CLK" at 2815.52,1310.3 h30
  text "DIO" at 2925.52,1310.3 h30
  text "RST" at 3030.52,1310.3 h30
Mechanical 1:
  the board outline again, w10